# Altium PCB 2026.11.05.HMS.PD.CNHH.V6.0.PcbDoc (part 2 of 3)
Units mm, origin at the board's own origin, x right, y up, seen from the top; angles counter-clockwise.
Board outline 110 x 110 mm, 2 copper layers (Top Layer, Bottom Layer); 125 components, 86 nets, 366 pads, 882 vias.
Unrouted connection lines stored in the file: 779.
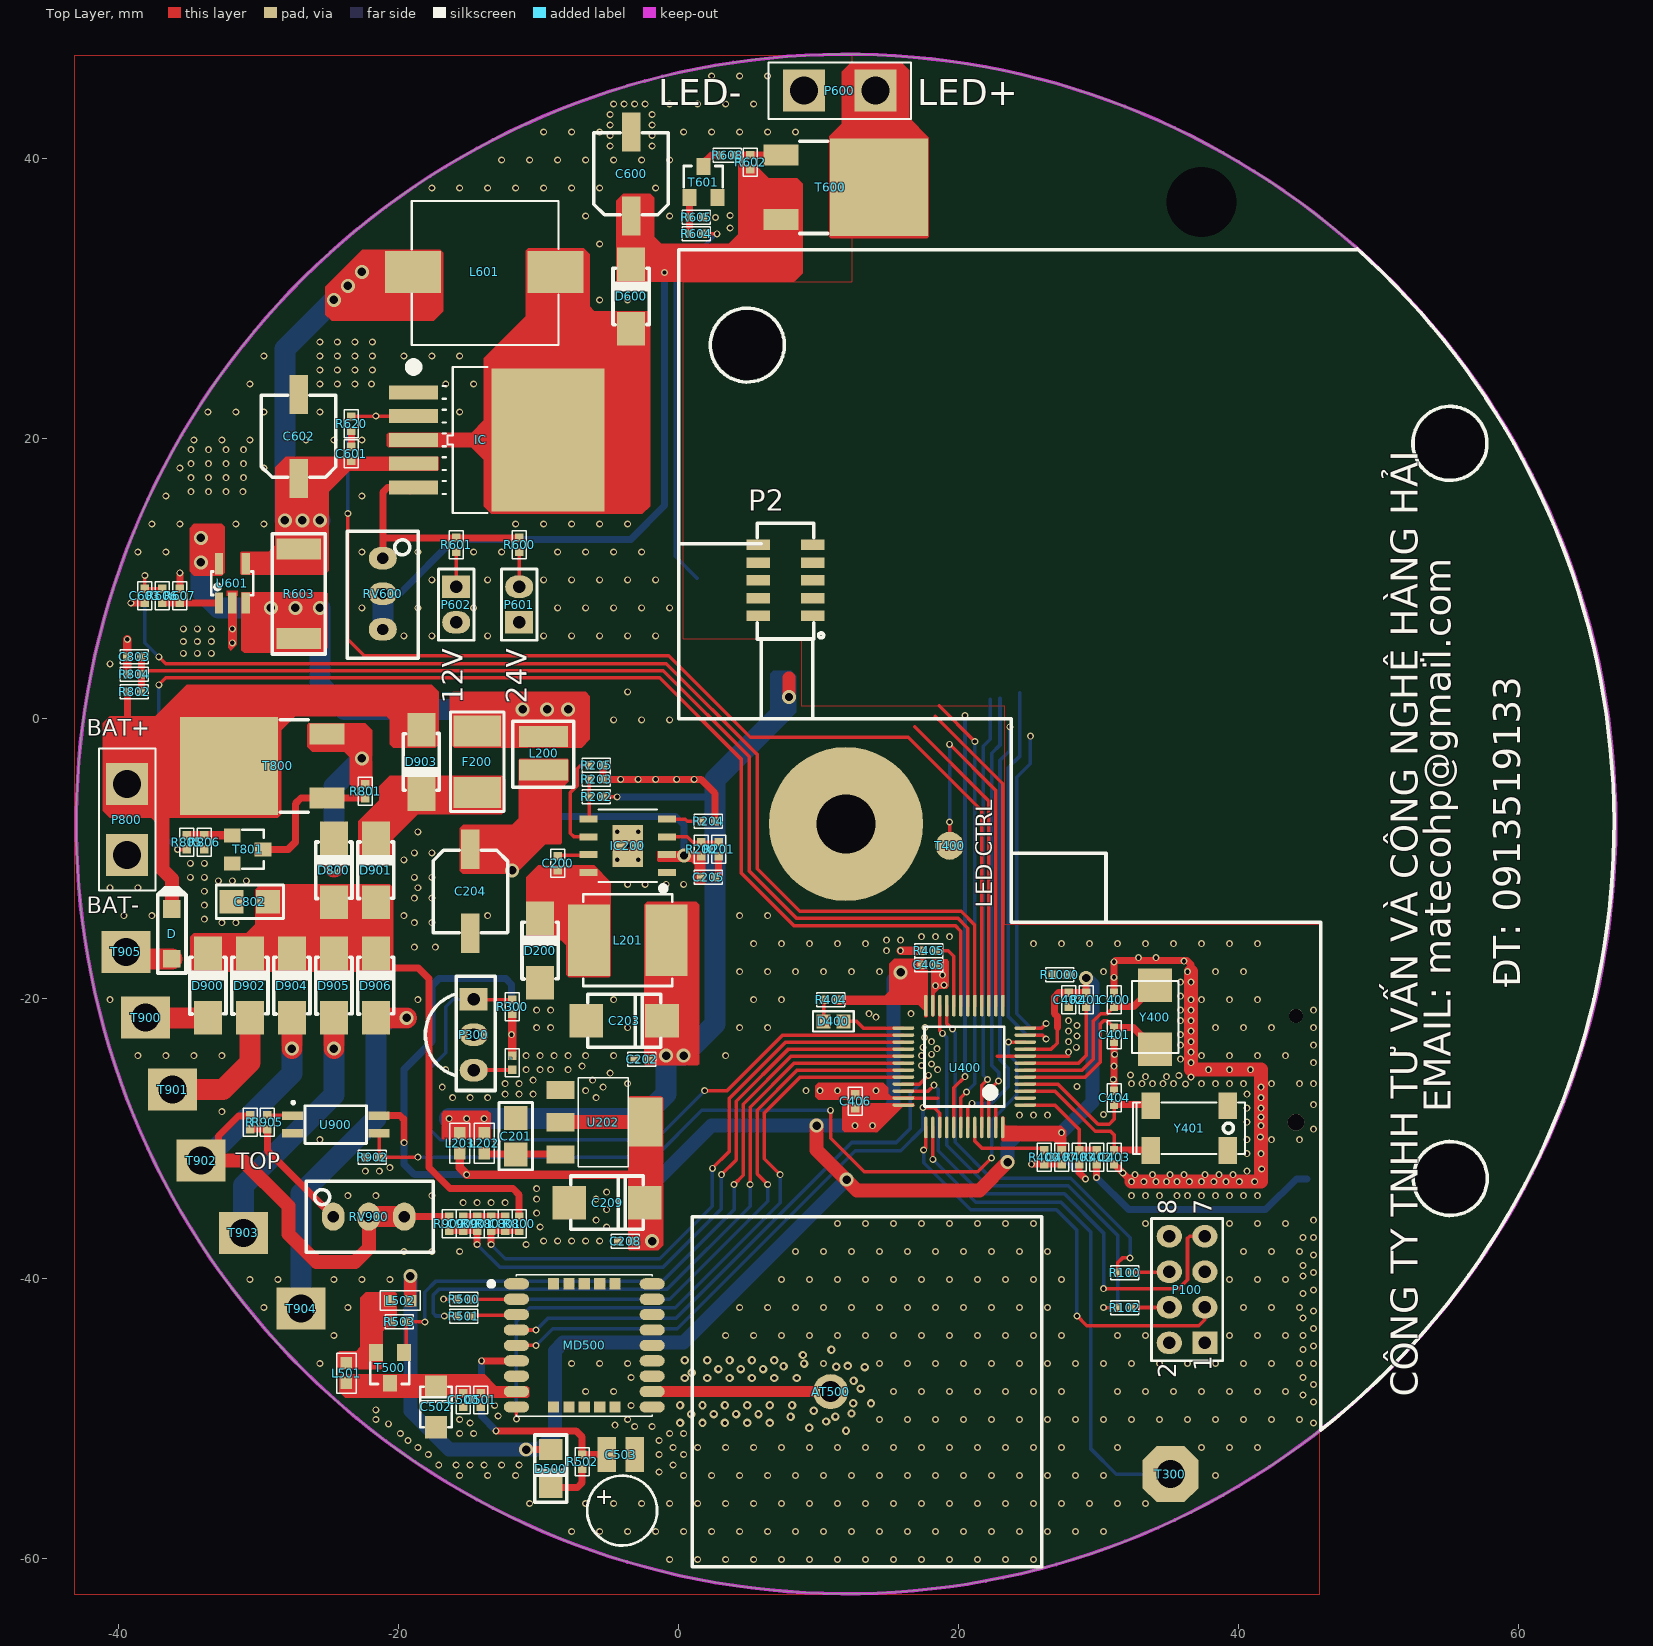
[diagram p0: Top Layer view]

## Via types
v1: diameter 0.5, hole 0.3, Top Layer to Bottom Layer, tented both sides, 802 vias
v2: diameter 0.6, hole 0.3, Top Layer to Bottom Layer, tented both sides, 48 vias
v3: diameter 1, hole 0.6, Top Layer to Bottom Layer, tented both sides, 32 vias

## Nets (pads, with @x,y where several pads share a name; then routed paths per layer and width w, separated by ;. In a path a pad name is that pad's centre, name@x,y a point inside that pad or via, vN(x,y) a via of type N, cw(c..) or ccw(c..) an arc to the next point about the centre after c; other vN are vias at no path point)
3.3V: `.1 C208.2 C209.1 C402.2 C405.2 C406.2 C407.2 D500.1 L203.2 L502.1 R300.2 R401.2 R403.1 R404.1 R1000.2 U202.2 U400.9 U400.24 U400.36 U400.48 U900.4 | length 201.5
  Top Layer w0.254: U400.9@24.75,-23.6 26.625,-23.6 27.05,-23.175 27.05,-22.075
  Top Layer w0.5: U900.4@-21.404,-28.357 -19.911,-28.357 -19.618,-28.65 v1(-19.618,-30.293) ; v3(-10.9,-52.225) D500.1@-9.15,-52.225 ; 27.05,-22.075 27.05,-21.275 26.85,-21.075 26.85,-19.868 27.143,-19.575 C402.2@27.85,-19.575 R401.2@29.1,-19.575 v3(29.1,-18.525) ; C407.2@27.35,-30.825 v1(27.35,-29.575) ; R403.1@28.6,-31.825 28.6,-32.425 v1(29.05,-32.875)
  Top Layer w0.6: L203.2@-15.65,-31.048 -15.65,-32.075 v1(-15.15,-32.575) -1.65,-32.575 ; `.1@-11.9,-24.075 R300.2@-11.9,-21.075 ; R404.1@11.35,-20.075 15.85,-20.075
  Top Layer w0.9: L502.1@-19.175,-41.575 v3(-19.175,-39.825)
  Top Layer w1: U202.2@-8.448,-28.825 -5.65,-28.825 U202.2@-2.352,-28.825 ; v3(9.85,-29.075) 9.85,-30.8 12.75,-33.7 21.475,-33.7 v3(23.5,-31.675)
  Bottom Layer w0.5: v1(-15.15,-32.575) -18.9,-32.575 -19.618,-31.857 v1(-19.618,-30.293) -19.618,-25.043 -17.65,-23.075 -17.65,-19.075 -17.15,-18.575 -16.15,-18.575 -12.35,-18.575 -11.95,-18.975 v1(-11.95,-22.575) ; v1(27.35,-29.575) 27.35,-31.175 v1(29.05,-32.875)
  Bottom Layer w0.6: v3@15.85,-18.176 v3(15.85,-18.125)
  Bottom Layer w1: v3(-19.175,-39.825) -19.175,-49.45 -16.4,-52.225 v3(-10.9,-52.225) -10,-52.225 -8.85,-51.075 -8.85,-45.161 -8.264,-44.575 0.35,-44.575 v3(12,-32.925) ; v3(-1.9,-37.325) -1.9,-33.325 2.35,-29.075 v3(9.85,-29.075) v1(12.6,-29.075) v1(13.85,-29.075) 15.35,-27.575 15.35,-18.625 v3(15.85,-18.125) ; v3(23.5,-31.675) 23.5,-30.425 24.35,-29.575 v1(27.35,-29.575) 29.55,-27.375 29.55,-18.975 v3(29.1,-18.525)